# Altium PCB Zotino-DIOT.PCBDOC (part 8 of 11)
Units mil, origin at the board's own origin, x right, y up, seen from the top; angles counter-clockwise.
Board outline 8771.61 x 3949.04 mil, 4 copper layers (TopLayer, Internal Plane 2, Signal Layer 1, BottomLayer), stack 61.54 mil thick; 915 components, 534 nets, 3073 pads, 1180 vias.
Unrouted connection lines stored in the file: 36.
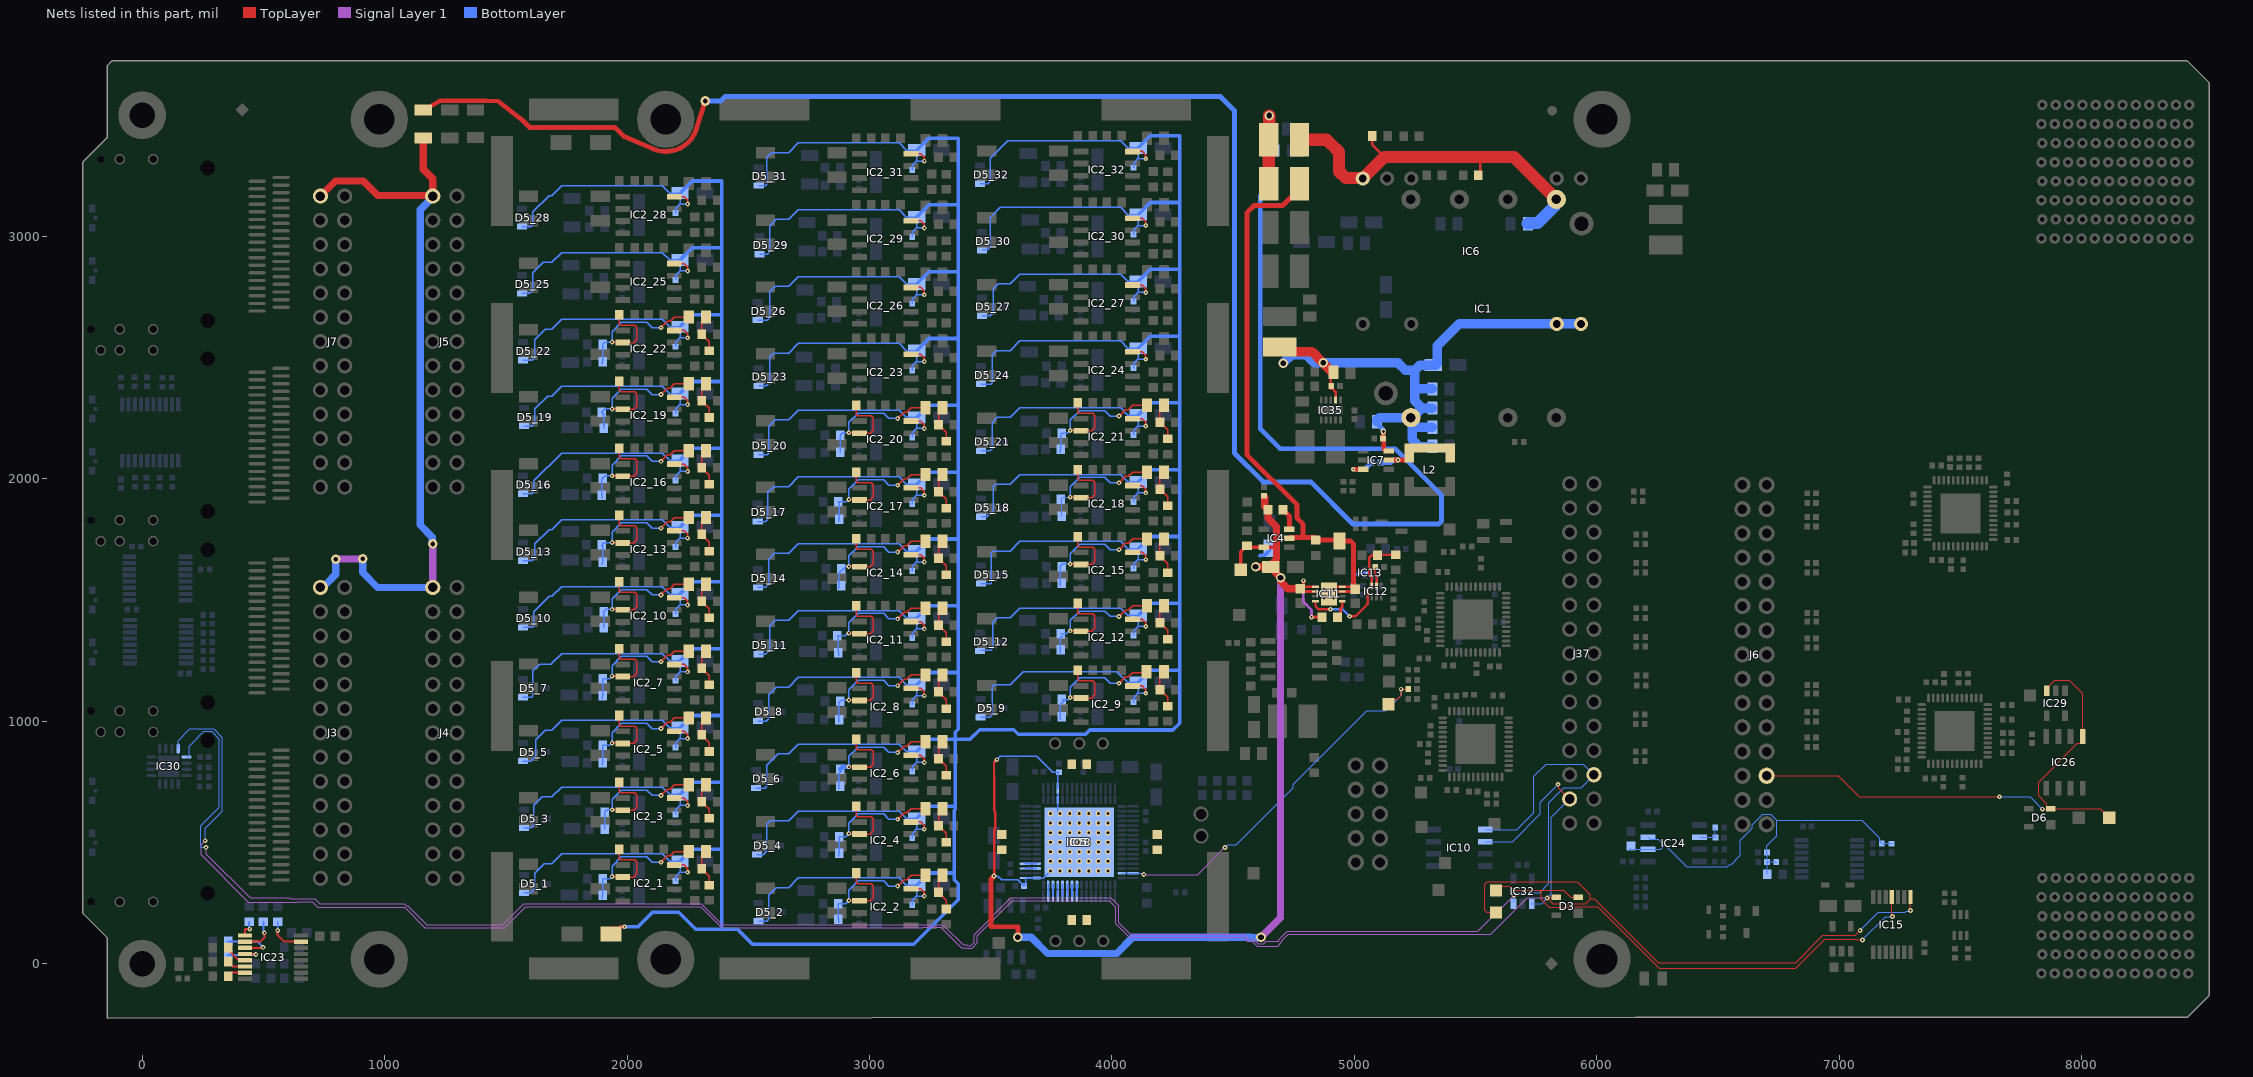
[diagram p9: the nets of this part, all layers, seen from the top]

## Via types
v1: diameter 19.68, hole 7.87, TopLayer to BottomLayer, tented both sides, 1050 vias
v2: diameter 23.62, hole 11.81, TopLayer to BottomLayer, tented both sides, 56 vias
v3: diameter 23.62, hole 11.81, TopLayer to BottomLayer, 28 vias
v4: diameter 39.37, hole 23.62, TopLayer to BottomLayer, tented both sides, 28 vias
v5: diameter 39.37, hole 19.68, TopLayer to BottomLayer, tented both sides, 7 vias
v6: diameter 19.68, hole 7.87, TopLayer to BottomLayer, tented bottom, 7 vias
v7: diameter 19.68, hole 7.87, TopLayer to BottomLayer, 4 vias

## Nets (pads, with @x,y where several pads share a name; then routed paths per layer and width w, separated by ;. In a path a pad name is that pad's centre, name@x,y a point inside that pad or via, vN(x,y) a via of type N, cw(c..) or ccw(c..) an arc to the next point about the centre after c; other vN are vias at no path point) (continued)
I2C_EEM1_SDA: D6.2 IC26.5 IC29.3 J6.26 TP19.1 | length 2250.8
  TopLayer w5: J6.26@6700.79,775.59 6996.06,775.59 7082.68,688.98 v1(7661.42,688.98) ; v1(7838.58,637.8) 7866.14,637.8 D6.2@7868.11,639.76 ; IC29.3@7856.3,1125.98 7856.3,1135.83 7889.76,1169.29 7948.82,1169.29 8004.13,1113.98 IC26.5@8004.13,937.01 8004.13,918.31 7994.82,909 7982.79,909 7822.83,749.04 7822.83,692.91 7854.86,660.89 7854.86,649.07 D6.2@7864.17,639.76 ; D6.2@7872.05,639.76 8076.77,639.76 TP19.1@8114.17,602.36
  BottomLayer w5: v1(7661.42,688.98) 7787.4,688.98 v1(7838.58,637.8)
I2C_SCL: D3.3 IC10.6 IC15.1 IC30.12 IC32.1 J37.27 TP12.1 | length 10332.9
  TopLayer w5: TP12.1@5584.41,212.13 5546.64,212.13 5538.24,220.54 5538.24,328.59 5548.64,339 5919.32,339 5973.48,284.84 5973.48,268.93 ; D3.3@5833.73,274.78 5833.53,274.58 5798.2,274.58 v1(5795.28,271.65) 5819.11,247.82 5954.84,247.82 5973.48,266.46 5973.48,268.93 ; v1(5840.35,740.73) 5843.16,737.92 5843.16,724.97 J37.27@5888.23,679.89 ; v1(7086.61,137.8) 7065.94,117.13 6933.07,117.13 6819.88,3.94 6254.17,3.94 5989.17,268.93 5973.48,268.93 ; v1(7293.89,219.89) IC15.1@7293.89,275.71
  Signal Layer 1 w5: v1(259.84,507.87) 244.09,492.13 244.09,448.82 438.5,254.41 641.73,254.41 643.23,255.91 700.79,255.91 724.41,232.28 1082.68,232.28 1165.35,149.61 1496.06,149.61 1582.68,236.22 2303.15,236.22 2389.76,149.61 3220.47,149.61 3222.39,151.52 3294.07,151.52 3378.66,66.93 3398.04,66.93 3400.24,64.73 3422.9,64.73 3425.1,66.93 3425.2,66.93 3444.49,86.22 3444.49,115.95 3588.38,259.84 3988.19,259.84 4015.75,232.28 4015.75,165.35 4070.87,110.24 4541.2,110.24 4558.85,92.59 4579.52,92.59 4599.52,72.59 4683.12,72.59 4700.79,90.26 4700.79,94.49 4728.35,122.05 5562.99,122.05 5712.6,271.65 v1(5795.28,271.65)
  BottomLayer w5: IC30.12@148.62,887.8 148.62,920.28 197.15,968.81 294.97,968.81 330.71,933.07 330.71,629.92 259.84,559.06 v1(259.84,507.87) ; IC10.6@5539.61,503.87 5652.98,503.87 5767.67,618.56 5767.67,666.89 5840.84,740.06 5840.35,740.54 v1(5840.35,740.73) ; IC32.1@5731.4,247.82 5732.31,248.73 5772.35,248.73 v1(5795.28,271.65) 5812.23,288.61 5812.23,603.89 J37.27@5888.23,679.89 ; v1(7086.61,137.8) 7161.04,212.22 7272.18,212.22 7277.04,217.08 7291.08,217.08 v1(7293.89,219.89)
I2C_SDA: D3.2 IC10.5 IC15.4 IC30.13 IC32.3 J37.26 TP11.1 | length 10261.1
  TopLayer w5: TP11.1@5584.41,302.69 5606.91,320.19 5641.34,320.19 5658.84,302.69 ; v1(5658.84,282.89) 5658.84,302.68 ; D3.2@5924.28,274.78 5891.84,274.78 5863.94,302.69 5770.67,302.69 ; v1(7095.56,98.43) 7076.77,98.43 7074.82,100.38 6939.95,100.38 6820.87,-18.7 6256.89,-18.7 6003.15,235.04 5887.51,235.04 5885.14,232.66 5804.74,232.66 5770.67,266.73 5770.67,302.69 ; IC15.4@7217.12,275.71 7217.12,197.25 v1(7219.49,194.88) ; 5658.84,302.69 5770.67,302.69
  Signal Layer 1 w5: v1(263.78,480.31) 263.78,452.76 444.88,271.65 606.3,271.65 610.24,267.72 712.6,267.72 732.28,248.03 1081.07,248.03 1088.95,240.16 1094.49,240.16 1173.23,161.42 1488.19,161.42 1574.8,248.03 2307.09,248.03 2393.7,161.42 3110.24,161.42 3110.34,161.52 3298.21,161.52 3306.19,153.54 3311.02,153.54 3385.83,78.74 3400.37,78.74 3404.39,74.73 3418.75,74.73 3420.95,76.93 3421.05,76.93 3424.07,79.94 3424.07,80.04 3431.26,87.24 3431.26,120.14 3582.77,271.65 3996.06,271.65 4027.56,240.16 4027.56,169.29 4074.8,122.05 4543.53,122.05 4562.99,102.59 4583.66,102.59 4603.66,82.59 4626.18,82.59 4636.18,92.59 4688.98,92.59 4688.98,99.38 4723.45,133.86 5509.81,133.86 v1(5658.84,282.89)
  BottomLayer w5: IC30.13@183.07,853.35 190.29,853.35 194.35,857.4 194.35,896.74 232.22,934.62 232.22,936.54 254.49,958.81 285.98,958.81 318.9,925.89 318.9,645.67 242.5,569.27 242.5,483.24 245.43,480.31 v1(263.78,480.31) ; IC10.5@5539.61,553.87 5670.29,553.87 5740,623.58 5740,773.3 5790.67,823.97 5893.11,823.97 5893.23,824.09 5944.03,824.09 J37.26@5988.23,779.89 5935.11,726.77 5864.6,726.77 5802.23,664.4 5802.23,331.28 5763.84,292.89 5668.84,292.89 v1(5658.84,282.89) IC32.3@5658.84,252.89 ; v1(7095.56,98.43) 7192.01,194.88 v1(7219.49,194.88)
LDACn: IC5.63 IC18.63 R101.1 TP17.1 | length 1616.3
  TopLayer w5: TP17.1@5141.5,1070.4 5162.81,1091.72 5176.59,1091.72 5193.15,1108.27 v1(5193.15,1132.89) 5194.15,1131.89 R101.1@5222.64,1131.89
  Signal Layer 1 w5: v1(4131.65,368.08) 4354.53,368.08 v1(4466.3,479.85)
  BottomLayer w5: IC18.63@4040.41,373.55 IC5.63@4086.67,373.55 4126.18,373.55 v1(4131.65,368.08) ; v1(4466.3,479.85) 4478.11,491.66 4513.54,491.66 4747.68,725.79 4747.68,739.79 5050.72,1042.84 5127.72,1042.84 5193.15,1108.27 v1(5193.15,1132.89)
LED0: IC23.15 R113.1 | length 163.3
  TopLayer w8: v1(558.84,137.89) 558.84,117.89 585.41,91.32 IC23.15@655.77,91.32
  BottomLayer w8: v1(558.84,137.89) 559.31,138.36 R113.1@559.31,173.01
LED1: IC23.1 R114.1 | length 77.3
  TopLayer w8: IC23.1@423.49,116.91 423.49,142.54 423.84,142.89 v1(443.84,142.89)
  BottomLayer w8: R114.1@441.2,173.01 441.2,145.53 v1(443.84,142.89)
LED2: IC23.2 R115.1 | length 153.8
  TopLayer w8: IC23.2@423.49,91.32 487.27,91.32 503.84,107.89 v1(503.84,127.89)
  BottomLayer w8: R115.1@500.26,173.01 500.26,131.47 v1(503.84,127.89)
LED3: IC23.3 R119.1 | length 230.6
  TopLayer w8: IC23.3@423.49,65.73 496.68,65.73 v1(498.84,67.89)
  BottomLayer w8: R119.1@354.59,92.3 474.43,92.3 v1(498.84,67.89)
LED4: IC23.4 R120.1 | length 160.8
  TopLayer w8: IC23.4@423.49,40.13 466.6,40.13 v1(468.84,37.89)
  BottomLayer w8: R120.1@354.59,37.18 468.13,37.18 v1(468.84,37.89)
LED5: IC23.5 R121.1 | length 95.1
  TopLayer w8: R121.1@354.59,66.71 354.59,58.9 398.95,14.54 IC23.5@423.49,14.54
LED6: IC23.6 R122.1 | length 76.6
  TopLayer w8: R122.1@354.59,7.65 373.29,-11.05 IC23.6@423.49,-11.05
LED7: IC23.7 R123.1 | length 75
  TopLayer w8: R123.1@354.59,-51.4 369.35,-36.64 IC23.7@423.49,-36.64
N12V0A: C1.2 C5.2 C6.1 C27.1 C29.2 C50.2 C53.2 C92_1.2 C92_2.2 C92_3.2 C92_4.2 C92_5.2 C92_6.2 C92_7.2 C92_8.2 C92_9.2 C92_10.2 C92_11.2 C92_12.2 C92_13.2 C92_14.2 C92_15.2 C92_16.2 C92_17.2 C92_18.2 C92_19.2 C92_20.2 C92_21.2 C92_22.2 C92_23.2 C92_24.2 C92_25.2 C92_26.2 C92_27.2 C92_28.2 C92_29.2 C92_30.2 C92_31.2 C92_32.2 C93_1.2 C93_2.2 C93_3.2 C93_4.2 C93_5.2 C93_6.2 C93_7.2 C93_8.2 C93_9.2 C93_10.2 C93_11.2 C93_12.2 C93_13.2 C93_14.2 C93_15.2 C93_16.2 C93_17.2 C93_18.2 C93_19.2 C93_20.2 C93_21.2 C93_22.2 C93_23.2 C93_24.2 C93_25.2 C93_26.2 C93_27.2 C93_28.2 C93_29.2 C93_30.2 C93_31.2 C93_32.2 C147.2 D2.2 D5_1.1 D5_2.1 D5_3.1 D5_4.1 D5_5.1 D5_6.1 D5_7.1 D5_8.1 D5_9.1 D5_10.1 D5_11.1 D5_12.1 D5_13.1 D5_14.1 D5_15.1 D5_16.1 D5_17.1 D5_18.1 D5_19.1 D5_20.1 D5_21.1 D5_22.1 D5_23.1 D5_24.1 D5_25.1 D5_26.1 D5_27.1 D5_28.1 D5_29.1 D5_30.1 D5_31.1 D5_32.1 IC2_1.4 IC2_2.4 IC2_3.4 IC2_4.4 IC2_5.4 IC2_6.4 IC2_7.4 IC2_8.4 IC2_9.4 IC2_10.4 IC2_11.4 IC2_12.4 IC2_13.4 IC2_14.4 IC2_15.4 IC2_16.4 IC2_17.4 IC2_18.4 IC2_19.4 IC2_20.4 IC2_21.4 IC2_22.4 IC2_23.4 IC2_24.4 IC2_25.4 IC2_26.4 IC2_27.4 IC2_28.4 IC2_29.4 IC2_30.4 IC2_31.4 IC2_32.4 IC4.5 IC5.17 IC5.36 IC11.1 IC11.2 IC18.17 IC18.36 IC18.65 R8.1 R8.2 R9.1 R9.2 R10.1 R10.2 R12.1 R12.2 R69.2 TP9.1 | length 54335.2
  TopLayer w6: IC2_1.4@2194.9,408 2235,408 2250,393 v1(2250,377.72) ; IC2_3.4@2194.9,683.59 2235,683.59 2250,668.59 v1(2250,653.31) ; IC2_5.4@2194.9,959.18 2235,959.18 2250,944.18 v1(2250,928.91) ; IC2_7.4@2194.9,1234.77 2235,1234.77 2250,1219.77 v1(2250,1204.5) ; IC2_10.4@2194.9,1510.36 2235,1510.36 2250,1495.36 v1(2250,1480.09) ; IC2_13.4@2194.9,1785.95 2235,1785.95 2250,1770.95 v1(2250,1755.68) ; IC2_16.4@2194.9,2061.54 2235,2061.54 2250,2046.54 v1(2250,2031.27) ; IC2_19.4@2194.9,2337.13 2235,2337.13 2250,2322.13 v1(2250,2306.86) ; IC2_22.4@2194.9,2612.72 2235,2612.72 2250,2597.72 v1(2250,2582.45) ; IC2_25.4@2194.9,2888.32 2235,2888.32 2250,2873.32 v1(2250,2858.04) ; IC2_28.4@2194.9,3163.91 2235,3163.91 2250,3148.91 v1(2250,3133.63) ; IC2_2.4@3171.28,309.57 3211.38,309.57 3226.38,294.57 v1(3226.38,279.3) ; IC2_4.4@3171.28,585.17 3211.38,585.17 3226.38,570.17 v1(3226.38,554.89) ; IC2_6.4@3171.28,860.76 3211.38,860.76 3226.38,845.76 v1(3226.38,830.48) ; IC2_8.4@3171.28,1136.35 3211.38,1136.35 3226.38,1121.35 v1(3226.38,1106.07) ; IC2_11.4@3171.28,1411.94 3211.38,1411.94 3226.38,1396.94 v1(3226.38,1381.66) ; IC2_14.4@3171.28,1687.53 3211.38,1687.53 3226.38,1672.53 v1(3226.38,1657.25) ; IC2_17.4@3171.28,1963.12 3211.38,1963.12 3226.38,1948.12 v1(3226.38,1932.84) ; IC2_20.4@3171.28,2238.71 3211.38,2238.71 3226.38,2223.71 v1(3226.38,2208.43) ; IC2_23.4@3171.28,2514.3 3211.38,2514.3 3226.38,2499.3 v1(3226.38,2484.02) ; IC2_26.4@3171.28,2789.89 3211.38,2789.89 3226.38,2774.89 v1(3226.38,2759.61) ; IC2_29.4@3171.28,3065.48 3211.38,3065.48 3226.38,3050.48 v1(3226.38,3035.2) ; IC2_31.4@3171.28,3341.07 3211.38,3341.07 3226.38,3326.07 v1(3226.38,3310.8) ; IC2_9.4@4084.67,1146.19 4124.76,1146.19 4139.76,1131.19 v1(4139.76,1115.91) ; IC2_12.4@4084.67,1421.78 4124.76,1421.78 4139.76,1406.78 v1(4139.76,1391.5) ; IC2_15.4@4084.67,1697.37 4124.76,1697.37 4139.76,1682.37 v1(4139.76,1667.09) ; IC2_18.4@4084.67,1972.96 4124.76,1972.96 4139.76,1957.96 v1(4139.76,1942.68) ; IC2_21.4@4084.67,2248.55 4124.76,2248.55 4139.76,2233.55 v1(4139.76,2218.27) ; IC2_24.4@4084.67,2524.14 4124.76,2524.14 4139.76,2509.14 v1(4139.76,2493.87) ; IC2_27.4@4084.67,2799.73 4124.76,2799.73 4139.76,2784.73 v1(4139.76,2769.46) ; IC2_30.4@4084.67,3075.32 4124.76,3075.32 4139.76,3060.32 v1(4139.76,3045.05) ; IC2_32.4@4084.67,3350.91 4124.76,3350.91 4139.76,3335.91 v1(4139.76,3320.64)
  TopLayer w10: v1(3513.54,361.74) 3515.35,363.56 3515.35,555.2 3518.11,557.96 3518.11,628.35 3515.35,631.1 3515.35,766.19 3515.07,766.47 3515.07,777.95 3513.54,779.48 3513.54,830.25 v1(3525.35,842.05)
  TopLayer w11.81: C29.2@4788.84,1547.35 4796.8,1555.31 IC11.1@4839.9,1555.31 ; v1(4790.12,1580.4) 4790.12,1560.63 C29.2@4776.84,1547.35 4788.56,1535.63 4789.27,1536.34 4822.75,1536.34 4823.46,1535.63 IC11.2@4839.9,1535.63 ; v1(4822.95,1429.97) 4867.24,1429.97 C27.1@4867.34,1429.87
  TopLayer w15: D2.2@1933.33,145.45 1966.62,145.45 1974.17,153 v1(1990,153) ; TP9.1@4531.56,1625.21 4531.56,1700.08 4555.2,1723.71 4564.16,1723.71 4569.83,1718.04 IC4.5@4624.02,1718.04 ; IC4.5@4620.69,1714.71 IC4.5@4624.02,1718.04 ; 4678.9,1716.07 4676.93,1718.04 IC4.5@4625.75,1718.04 IC4.5@4624.02,1718.04
  TopLayer w20: v1(3513.54,361.74) 3501.73,349.94 3501.73,153.08 3611.97,153.08 v4(3611.97,109.77)
  TopLayer w30: v4(4592.48,1637.33) C1.2@4655.28,1637.33 ; C5.2@4630.99,1924.73 4630.99,1886.03 C6.1@4643.46,1873.55 4643.46,1838.12 4678.9,1802.69 4678.9,1716.07 4678.9,1668.83 4655.28,1645.2 C1.2@4655.28,1637.33 ; C29.2@4776.84,1547.35 4725.57,1547.35 4697.37,1575.55 4697.37,1590.26 v4(4695.58,1592.06) 4675.71,1611.93 4675.71,1627.72 4666.1,1637.33 C1.2@4655.28,1637.33
  Signal Layer 1 w11.81: v1(4790.12,1580.4) 4789.07,1579.36 4789.07,1493.94 4822.95,1460.06 v1(4822.95,1429.97)
  Signal Layer 1 w30: v4(4614.92,109.77) 4695.58,190.43 v4(4695.58,1592.06)
  BottomLayer w6: D5_25.1@1566.69,2765.28 1598.19,2765.28 1611.97,2779.06 1611.97,2849.93 1655.35,2893.32 1690,2893.32 1730,2933.32 2145.77,2933.32 2175.77,2903.32 C93_25.2@2218.82,2903.32 2218.82,2859.22 ; D5_28.1@1566.69,3040.87 1602.13,3040.87 1611.97,3050.72 1611.97,3101.9 1678.98,3168.91 1690,3168.91 1730,3208.91 2145.77,3208.91 2175.77,3178.91 C93_28.2@2218.82,3178.91 2218.82,3134.81 ; D5_5.1@1570.63,836.15 1602.13,836.15 1623.78,857.8 1623.78,924.73 1663.23,964.18 1690,964.18 1730,1004.18 2145.77,1004.18 2175.77,974.18 C93_5.2@2218.82,974.18 2218.82,930.09 ; D5_7.1@1570.63,1099.93 1606.06,1099.93 1611.97,1105.83 1611.97,1208.2 1639.53,1235.76 1690,1235.76 1690,1239.77 1730,1279.77 2145.77,1279.77 2175.77,1249.77 C93_7.2@2218.82,1249.77 2218.82,1205.68 ; D5_10.1@1570.63,1387.33 1610,1387.33 1615.91,1393.24 1615.91,1452.29 1678.98,1515.36 1690,1515.36 1730,1555.36 2145.77,1555.36 2175.77,1525.36 C93_10.2@2218.82,1525.36 2218.82,1481.27 ; D5_13.1@1570.63,1662.92 1606.06,1662.92 1619.84,1676.7 1619.84,1731.82 1678.98,1790.95 1690,1790.95 1730,1830.95 2145.77,1830.95 2175.77,1800.95 C93_13.2@2218.82,1800.95 2218.82,1756.86 ; D5_16.1@1570.63,1938.51 1606.06,1938.51 1615.91,1948.35 1615.91,1992.45 1730,2106.54 2145.77,2106.54 2175.77,2076.54 C93_16.2@2218.82,2076.54 2218.82,2032.45 ; D5_22.1@1570.63,2489.69 1610,2489.69 1619.84,2499.54 1619.84,2574.34 1663.23,2617.72 1690,2617.72 1730,2657.72 2145.77,2657.72 2175.77,2627.72 C93_22.2@2218.82,2627.72 2218.82,2583.63 ; D5_1.1@1574.57,292.1 1602.13,292.1 1619.84,309.82 1619.84,373.55 1659.29,413 1690,413 1730,453 2145.77,453 2175.77,423 C93_1.2@2218.82,423 2218.82,378.91 ; D5_3.1@1574.57,560.56 1604.96,560.56 1615.91,571.51 1615.91,655.05 1649.45,688.59 1690,688.59 1730,728.59 2145.77,728.59 2175.77,698.59 C93_3.2@2218.82,698.59 2218.82,654.5 ; D5_19.1@1574.57,2218.04 1606.06,2218.04 1619.84,2231.82 1619.84,2288.92 1673.06,2342.13 1690,2342.13 1730,2382.13 2145.77,2382.13 2175.77,2352.13 C93_19.2@2218.82,2352.13 2218.82,2308.04 ; C92_1.2@2200,340.72 2200,360.09 2218.82,378.91 ; C92_3.2@2200,616.31 2200,635.68 2218.82,654.5 ; C92_5.2@2200,891.9 2200,911.27 2218.82,930.09 ; C92_7.2@2200,1167.49 2200,1186.86 2218.82,1205.68 ; C92_10.2@2200,1443.08 2200,1462.45 2218.82,1481.27 ; C92_13.2@2200,1718.67 2200,1738.04 2218.82,1756.86 ; C92_16.2@2200,1994.26 2200,2013.63 2218.82,2032.45 ; C92_19.2@2200,2269.85 2200,2289.22 2218.82,2308.04 ; C92_22.2@2200,2545.44 2200,2564.81 2218.82,2583.63 ; C92_25.2@2200,2821.03 2200,2840.4 2218.82,2859.22 ; C92_28.2@2200,3096.62 2200,3115.99 2218.82,3134.81 ; v1(2250,377.72) 2220,377.72 2218.82,378.91 ; v1(2250,653.31) 2220,653.31 2218.82,654.5 ; v1(2250,928.91) 2220,928.91 2218.82,930.09 ; v1(2250,1204.5) 2220,1204.5 2218.82,1205.68 ; v1(2250,1480.09) 2220,1480.09 2218.82,1481.27 ; v1(2250,1755.68) 2220,1755.68 2218.82,1756.86 ; v1(2250,2031.27) 2220,2031.27 2218.82,2032.45 ; v1(2250,2306.86) 2220,2306.86 2218.82,2308.04 ; v1(2250,2582.45) 2220,2582.45 2218.82,2583.63 ; v1(2250,2858.04) 2220,2858.04 2218.82,2859.22 ; v1(2250,3133.63) 2220,3133.63 2218.82,3134.81 ; D5_6.1@2531.88,725.16 2569.88,725.16 2576.54,731.82 2576.54,818.43 2623.86,865.76 2666.38,865.76 2706.38,905.76 3122.15,905.76 3152.15,875.76 C93_6.2@3195.2,875.76 3195.2,831.66 ; D5_4.1@2535.2,450.32 2562.76,450.32 2576.54,464.1 2576.54,575.83 2590.87,590.17 2666.38,590.17 2706.38,630.17 3122.15,630.17 3152.15,600.17 C93_4.2@3195.2,600.17 3195.2,556.07 ; D5_17.1@2539.13,1824.34 2570.63,1824.34 2580.47,1834.18 2580.47,1944.42 2604.17,1968.12 2666.38,1968.12 2706.38,2008.12 3122.15,2008.12 3152.15,1978.12 C93_17.2@3195.2,1978.12 3195.2,1934.02 ; D5_26.1@2539.13,2655.05 2578.5,2655.05 2588.35,2664.89 2588.35,2771.19 2612.05,2794.89 2666.38,2794.89 2706.38,2834.89 3122.15,2834.89 3152.15,2804.89 C93_26.2@3195.2,2804.89 3195.2,2760.8 ; D5_8.1@2539.33,1001.5 2574.57,1001.5 2584.6,1011.54 2584.6,1109.97 2615.98,1141.35 2666.38,1141.35 2706.38,1181.35 3122.15,1181.35 3152.15,1151.35 C93_8.2@3195.2,1151.35 3195.2,1107.25 ; D5_14.1@2539.33,1552.69 2570.63,1552.69 2584.41,1566.46 2584.41,1668.83 2608.11,1692.53 2666.38,1692.53 2706.38,1732.53 3122.15,1732.53 3152.15,1702.53 C93_14.2@3195.2,1702.53 3195.2,1658.43 ; D5_2.1@2543.07,175.94 2575.78,175.94 2584.41,184.57 2584.41,283 2615.98,314.57 2666.38,314.57 2706.38,354.57 3122.15,354.57 3152.15,324.57 C93_2.2@3195.2,324.57 3195.2,280.48 ; D5_11.1@2543.07,1277.09 2570.63,1277.09 2588.35,1294.81 2588.35,1393.24 2612.05,1416.94 2666.38,1416.94 2706.38,1456.94 3122.15,1456.94 3152.15,1426.94 C93_11.2@3195.2,1426.94 3195.2,1382.84 ; D5_20.1@2543.07,2099.93 2578.5,2099.93 2584.41,2105.83 2584.41,2216.07 2612.05,2243.71 2666.38,2243.71 2706.38,2283.71 3122.15,2283.71 3152.15,2253.71 C93_20.2@3195.2,2253.71 3195.2,2209.61 ; D5_23.1@2543.07,2383.39 2574.57,2383.39 2588.35,2397.17 2588.35,2503.47 2604.17,2519.3 2666.38,2519.3 2706.38,2559.3 3122.15,2559.3 3152.15,2529.3 C93_23.2@3195.2,2529.3 3195.2,2485.21 ; D5_31.1@2543.27,3210.17 2570.43,3210.17 2576.73,3216.46 2576.73,3326.5 2596.3,3346.07 2666.38,3346.07 2706.38,3386.07 3122.15,3386.07 3152.15,3356.07 C93_31.2@3195.2,3356.07 3195.2,3311.98 ; D5_29.1@2547.01,2926.7 2578.5,2926.7 2588.35,2936.54 2588.35,3042.84 2615.98,3070.48 2666.38,3070.48 2706.38,3110.48 3122.15,3110.48 3152.15,3080.48 C93_29.2@3195.2,3080.48 3195.2,3036.39 ; C92_2.2@3176.38,242.29 3176.38,261.66 3195.2,280.48 ; C92_4.2@3176.38,517.88 3176.38,537.25 3195.2,556.07 ; C92_6.2@3176.38,793.47 3176.38,812.84 3195.2,831.66 ; C92_8.2@3176.38,1069.06 3176.38,1088.43 3195.2,1107.25 ; C92_11.2@3176.38,1344.65 3176.38,1364.02 3195.2,1382.84 ; C92_14.2@3176.38,1620.24 3176.38,1639.62 3195.2,1658.43 ; C92_17.2@3176.38,1895.83 3176.38,1915.21 3195.2,1934.02 ; C92_20.2@3176.38,2171.43 3176.38,2190.8 3195.2,2209.61 ; C92_23.2@3176.38,2447.02 3176.38,2466.39 3195.2,2485.21 ; C92_26.2@3176.38,2722.61 3176.38,2741.98 3195.2,2760.8 ; C92_29.2@3176.38,2998.2 3176.38,3017.57 3195.2,3036.39 ; C92_31.2@3176.38,3273.79 3176.38,3293.16 3195.2,3311.98 ; v1(3226.38,279.3) 3196.38,279.3 3195.2,280.48 ; v1(3226.38,554.89) 3196.38,554.89 3195.2,556.07 ; v1(3226.38,830.48) 3196.38,830.48 3195.2,831.66 ; v1(3226.38,1106.07) 3196.38,1106.07 3195.2,1107.25 ; v1(3226.38,1381.66) 3196.38,1381.66 3195.2,1382.84 ; v1(3226.38,1657.25) 3196.38,1657.25 3195.2,1658.43 ; v1(3226.38,1932.84) 3196.38,1932.84 3195.2,1934.02 ; v1(3226.38,2208.43) 3196.38,2208.43 3195.2,2209.61 ; v1(3226.38,2484.02) 3196.38,2484.02 3195.2,2485.21 ; v1(3226.38,2759.61) 3196.38,2759.61 3195.2,2760.8 ; v1(3226.38,3035.2) 3196.38,3035.2 3195.2,3036.39 ; v1(3226.38,3310.8) 3196.38,3310.8 3195.2,3311.98 ; D5_32.1@3456.46,3218.04 3487.95,3218.04 3497.8,3227.88 3497.8,3322.37 3571.34,3395.91 4035.53,3395.91 4065.53,3365.91 C93_32.2@4108.58,3365.91 4108.58,3321.82 ; D5_9.1@3458.62,1017.25 3495.83,1017.25 3505.67,1027.09 3505.67,1143.14 3513.72,1151.19 3579.76,1151.19 3634.31,1205.73 4020.99,1205.73 4065.53,1161.19 C93_9.2@4108.58,1161.19 4108.58,1117.09 ; D5_12.1@3458.62,1292.84 3499.76,1292.84 3509.24,1302.32 3509.24,1408.62 3527.4,1426.78 3579.76,1426.78 3619.76,1466.78 4035.53,1466.78 4065.53,1436.78 C93_12.2@4108.58,1436.78 4108.58,1392.69 ; D5_15.1@3459.66,1568.43 3499.76,1568.43 3501.73,1570.4 3501.73,1696.39 3507.72,1702.37 3579.76,1702.37 3619.76,1742.37 4035.53,1742.37 4065.53,1712.37 C93_15.2@4108.58,1712.37 4108.58,1668.28 ; D5_18.1@3460.39,1844.02 3484.02,1844.02 3509.61,1869.61 3509.61,1968.04 3519.53,1977.96 3579.76,1977.96 3619.76,2017.96 4035.53,2017.96 4065.53,1987.96 C93_18.2@4108.58,1987.96 4108.58,1943.87 ; D5_21.1@3460.39,2115.68 3495.83,2115.68 3505.67,2125.52 3505.67,2231.82 3527.4,2253.55 3579.76,2253.55 3619.76,2293.55 4035.53,2293.55 4065.53,2263.55 C93_21.2@4108.58,2263.55 4108.58,2219.46 ; D5_24.1@3460.39,2391.27 3499.76,2391.27 3505.67,2397.17 3505.67,2511.35 3523.46,2529.14 3579.76,2529.14 3619.76,2569.14 4035.53,2569.14 4065.53,2539.14 C93_24.2@4108.58,2539.14 4108.58,2495.05 ; D5_27.1@3464.33,2672.2 3497.24,2672.2 3509.61,2684.57 3509.61,2783 3531.34,2804.73 3579.76,2804.73 3619.76,2844.73 4035.53,2844.73 4065.53,2814.73 C93_27.2@4108.58,2814.73 4108.58,2770.64 ; D5_30.1@3464.33,2946.39 3487.95,2946.39 3497.8,2956.23 3497.8,3078.28 3539.84,3120.32 4035.53,3120.32 4065.53,3090.32 C93_30.2@4108.58,3090.32 4108.58,3046.23 ; v1(3513.54,361.74) 3530.08,361.74 3545.3,346.51 3611.93,346.51 C53.2@3632.14,326.31 ; v1(3525.35,842.05) 3539.28,855.99 3689.88,855.99 3755.73,790.13 C50.2@3781.26,790.13 3776.63,785.5 IC5.36@3776.63,722.96 ; C53.2@3637.56,320.59 3637.56,320.88 C53.2@3632.14,326.31 ; v2(3747.1,383.39) 3717.57,353.87 IC18.17@3690.02,353.87 IC5.17@3643.76,353.87 3643.76,326.31 C53.2@3632.14,326.31 ; IC18.65@3776.63,625.52 IC18.36@3776.63,676.7 IC5.36@3776.63,703.57 ; C92_9.2@4089.77,1078.9 4089.76,1098.28 4108.58,1117.09 ; C92_12.2@4089.76,1354.49 4089.76,1373.87 4108.58,1392.69 ; C92_15.2@4089.76,1630.09 4089.76,1649.46 4108.58,1668.28 ; C92_18.2@4089.77,1905.68 4089.76,1925.05 4108.58,1943.87 ; C92_21.2@4089.77,2181.27 4089.76,2200.64 4108.58,2219.46 ; C92_24.2@4089.76,2456.86 4089.76,2476.23 4108.58,2495.05 ; C92_27.2@4089.76,2732.45 4089.76,2751.82 4108.58,2770.64 ; C92_30.2@4089.77,3008.04 4089.76,3027.41 4108.58,3046.23 ; C92_32.2@4089.76,3283.63 4089.76,3303 4108.58,3321.82 ; v1(4139.76,1115.91) 4109.76,1115.91 4108.58,1117.09 ; v1(4139.76,1391.5) 4109.76,1391.5 4108.58,1392.69 ; v1(4139.76,1667.09) 4109.76,1667.09 4108.58,1668.28 ; v1(4139.76,1942.68) 4109.76,1942.68 4108.58,1943.87 ; v1(4139.76,2218.27) 4109.76,2218.27 4108.58,2219.46 ; v1(4139.76,2493.87) 4109.76,2493.87 4108.58,2495.05 ; v1(4139.76,2769.46) 4109.76,2769.46 4108.58,2770.64 ; v1(4139.76,3045.05) 4109.76,3045.05 4108.58,3046.23 ; v1(4139.76,3320.64) 4109.76,3320.64 4108.58,3321.82
  BottomLayer w15: v1(1990,153) 2045.29,153 2105.11,212.82 2213.31,212.82 2283.13,143 2390,143 ; C93_1.2@2218.82,423 2268.82,473 2390,473 ; C93_3.2@2218.82,698.59 2268.82,748.59 2390,748.59 ; C93_5.2@2218.82,974.18 2268.82,1024.18 2390,1024.18 ; C93_7.2@2218.82,1249.77 2268.82,1299.77 2390,1299.77 ; C93_10.2@2218.82,1525.36 2268.82,1575.36 2390,1575.36 ; C93_13.2@2218.82,1800.95 2268.82,1850.95 2390,1850.95 ; C93_16.2@2218.82,2076.54 2268.82,2126.54 2390,2126.54 ; C93_19.2@2218.82,2352.13 2268.82,2402.13 2390,2402.13 ; C93_22.2@2218.82,2627.72 2268.82,2677.72 2390,2677.72 ; C93_25.2@2218.82,2903.32 2268.82,2953.32 2390,2953.32 ; C93_28.2@2218.82,3178.91 2268.82,3228.91 2390,3228.91 2390,2953.32 ; C93_2.2@3195.2,324.57 3245.2,374.57 3349.47,374.57 ; C93_4.2@3195.2,600.17 3245.2,650.17 3353.41,650.17 ; C93_6.2@3195.2,875.76 3245.2,925.76 3353.41,925.76 ; C93_8.2@3195.2,1151.35 3245.2,1201.35 3366.38,1201.35 ; C93_11.2@3195.2,1426.94 3245.2,1476.94 3366.38,1476.94 ; C93_14.2@3195.2,1702.53 3245.2,1752.53 3366.38,1752.53 ; C93_17.2@3195.2,1978.12 3245.2,2028.12 3366.38,2028.12 ; C93_20.2@3195.2,2253.71 3245.2,2303.71 3366.38,2303.71 ; C93_23.2@3195.2,2529.3 3245.2,2579.3 3366.38,2579.3 ; C93_26.2@3195.2,2804.89 3245.2,2854.89 3366.38,2854.89 ; C93_29.2@3195.2,3080.48 3245.2,3130.48 3366.38,3130.48 ; C93_31.2@3195.2,3356.07 3245.2,3406.07 3366.38,3406.07 3366.38,3130.48 ; C93_9.2@4108.58,1161.19 4158.58,1211.19 4279.76,1211.19 ; C93_12.2@4108.58,1436.78 4158.58,1486.78 4279.76,1486.78 ; C93_15.2@4108.58,1712.37 4158.58,1762.37 4279.76,1762.37 ; C93_18.2@4108.58,1987.96 4158.58,2037.96 4279.76,2037.96 ; C93_21.2@4108.58,2263.55 4158.58,2313.55 4279.76,2313.55 ; C93_24.2@4108.58,2539.14 4158.58,2589.14 4279.76,2589.14 ; C93_27.2@4108.58,2814.73 4158.58,2864.73 4279.76,2864.73 ; C93_30.2@4108.58,3090.32 4158.58,3140.32 4279.76,3140.32 ; C93_32.2@4108.58,3365.91 4158.58,3415.91 4279.76,3415.91 ; 4280,3415.91 4280,1211.42 4279.76,1211.19 ; 4610,1682.61 4611.27,1682.61 4614.59,1685.93 4633.2,1685.93 4633.2,1688.48 4650.3,1705.59 C147.2@4650.3,1713.87 ; 2390,143 2455.44,143 2517.9,80.55 3182.62,80.55 3366.38,264.3 3366.38,330.24 3349.47,347.15 3349.47,374.57 ; 2390,143 2390,473 ; 2390,473 2390,748.59 ; 2390,748.59 2390,1024.18 ; 2390,1024.18 2390,1299.77 ; 2390,1299.77 2390,1575.36 ; 2390,1575.36 2390,1850.95 ; 2390,1850.95 2390,2126.54 ; 2390,2126.54 2390,2402.13 ; 2390,2402.13 2390,2677.72 ; 2390,2677.72 2390,2953.32 ; 3349.47,374.57 3349.47,633.26 3353.41,637.19 3353.41,650.17 ; 3353.41,650.17 3353.41,925.76 ; 3353.41,925.76 3353.41,955.07 3366.38,968.04 3366.38,1201.35 ; 3353.41,925.76 3414.9,925.76 3454.49,965.34 3595.45,965.34 3613.72,947.07 3891.34,947.07 3908.6,964.33 4251.33,964.33 4279.76,992.76 4279.76,1211.19 ; 3366.38,1201.35 3366.38,1476.94 ; 3366.38,1476.94 3366.38,1752.53 ; 3366.38,1752.53 3366.38,2028.12 ; 3366.38,2028.12 3366.38,2303.71 ; 3366.38,2303.71 3366.38,2579.3 ; 3366.38,2579.3 3366.38,2854.89 ; 3366.38,2854.89 3366.38,3130.48
  BottomLayer w30: v4(3611.97,109.77) 3667.09,109.77 3734.02,42.84 4019.45,42.84 4086.38,109.77 4573.7,109.77 4575.99,107.49 4612.64,107.49 v4(4614.92,109.77)
  other v2: 3786.47,383.39 3825.84,383.39 3865.21,383.39 3904.58,383.39 3943.95,383.39 3983.32,383.39 3747.1,422.76 3786.47,422.76 3825.84,422.76 3865.21,422.76 3904.58,422.76 3943.95,422.76 3983.32,422.76 3747.1,462.13 3786.47,462.13 3825.84,462.13 3865.21,462.13 3904.58,462.13 3943.95,462.13 3983.32,462.13 3747.1,501.5 3786.47,501.5 3825.84,501.5 3865.21,501.5 3904.58,501.5 3943.95,501.5 3983.32,501.5 3747.1,540.87 3786.47,540.87 3825.84,540.87 3865.21,540.87 3904.58,540.87 3943.95,540.87 3983.32,540.87 3747.1,580.24 3786.47,580.24 3825.84,580.24 3865.21,580.24 3904.58,580.24 3943.95,580.24 3983.32,580.24 3747.1,619.61 3786.47,619.61 3825.84,619.61 3865.21,619.61 3904.58,619.61 3943.95,619.61 3983.32,619.61
N13V0: C141.2 IC1.4 IC6.11 L9.1 R4.1 R27.1 | length 1640.3
  TopLayer w10: R27.1@5074.27,3414.64 5074.27,3377.49 5123.72,3328.05 ; R4.1@5511.5,3253 5520,3261.5 5520,3328.05
  TopLayer w50: L9.1@4773.12,3399.29 4885.82,3399.29 4902.76,3382.34 4936.77,3348.34 4936.77,3268.54 4964.33,3240.98 5033.19,3240.98 IC6.11@5034.92,3239.25 5123.72,3328.05 5520,3328.05 5658.68,3328.05 IC1.4@5833.84,3152.89
  BottomLayer w50: C141.2@5715.43,3053 5717.99,3055.56 5756.62,3055.56 5828.04,3126.98 5828.04,3147.5 IC1.4@5833.54,3153
N13V0_SCSI: J3.26 J4.26 J5.26 J7.26 R32.2 | length 3062.2
  TopLayer w30: J7.26@735.19,3166.71 797.82,3229.33 911.42,3229.33 971.46,3169.29 1198.28,3169.29 1198.28,3238.44 1159.21,3277.52 R32.2@1159.21,3407.02 ; R32.2@1179.39,3407.02 R32.2@1179.39,3413.17
  Signal Layer 1 w30: v5(798.73,1668.79) 799.97,1670.02 908.21,1670.02 v5(909.45,1671.26) ; J4.26@1198.29,1552.53 1198.43,1552.68 1198.43,1731.67 v5(1198.58,1731.82)
  BottomLayer w30: J3.26@735.19,1552.53 744.12,1552.53 760.62,1569.03 760.96,1569.03 798.73,1606.8 v5(798.73,1668.79) ; v5(909.45,1671.26) 909.45,1614.17 971.09,1552.53 J4.26@1198.29,1552.53 ; J5.26@1198.29,3166.71 1198.28,3161.52 1146.79,3110.02 1146.79,1809.9 1196.79,1759.9 1196.79,1733.61 v5(1198.58,1731.82)
N_LDO_EN: C32.2 IC11.4 IC12.6 R35.2 | length 597.7
  TopLayer w10: IC11.4@4839.9,1496.26 4839.77,1496.26 4839.69,1496.18 4839.69,1475 4852,1462.69 v1(4901.23,1462.69) ; v1(4979.63,1433.5) 5004.3,1433.5 5055.43,1484.63 5055.43,1543.3 5061.29,1549.15 5071.04,1549.15 5071.04,1558.41 IC12.6@5071.55,1558.92 5071.55,1591.74 5062.25,1601.04 5062.25,1676.37 5070.67,1684.79 5094.2,1684.79 C32.2@5095.11,1685.7 5097.32,1687.92 R35.2@5171.67,1687.92
  BottomLayer w10: v1(4901.23,1462.69) 4950.45,1462.69 v1(4979.63,1433.5)
nc9: IC5.9 IC18.9 | length 46.3
  BottomLayer w7.87: IC5.9@3855.37,280.05 IC18.9@3855.37,326.31
nc10: IC5.10 IC18.10 | length 46.3
  BottomLayer w7.87: IC5.10@3835.69,280.05 IC18.10@3835.69,326.31
nc11: IC5.11 IC18.11 | length 46.3
  BottomLayer w7.87: IC5.11@3816,280.05 IC18.11@3816,326.31
nc12: IC5.12 IC18.12 | length 46.3
  BottomLayer w7.87: IC5.12@3796.32,280.05 IC18.12@3796.32,326.31
nc13: IC5.13 IC18.13 | length 46.3
  BottomLayer w7.87: IC5.13@3776.63,280.05 IC18.13@3776.63,326.31
nc14: IC5.14 IC18.14 | length 46.3
  BottomLayer w7.87: IC5.14@3756.94,280.05 IC18.14@3756.94,326.31
nc15: IC5.15 IC18.15 | length 46.3
  BottomLayer w7.87: IC5.15@3737.26,280.05 IC18.15@3737.26,326.31
nc19: IC5.19 IC18.19 | length 46.3
  BottomLayer w7.87: IC5.19@3643.76,393.24 IC18.19@3690.02,393.24
nc20: IC5.20 IC18.20 | length 46.3
  BottomLayer w7.87: IC5.20@3643.76,412.92 IC18.20@3690.02,412.92
NetC2_2: C2.2 C142.2 L9.2 L15.1 R32.1 | length 8536.2
  TopLayer w20: R32.1@1151.06,3524.13 1184.65,3533.83 1227.19,3558.83 1332.62,3560.05 1415.92,3560.05 1468.86,3557.84 1564.84,3482.67 1597.48,3450.02 1949.13,3450.02 1986.29,3412.87 2106.95,3361.36 ccw(c2159.21,3483.78) 2286.06,3443.43 v5(2322.83,3559.06)
  TopLayer w50: L15.1@4647.14,3225.96 L9.2@4647.14,3399.29 4649,3401.15 v4(4649,3499)
  BottomLayer w20: v5(2322.83,3559.06) 2385.9,3559.06 2404.38,3577.53 4447.28,3577.53 4505.67,3519.14 4505.67,2105.83 4623.78,1987.72 4820.63,1987.72 4994.1,1814.26 5348.51,1814.26 5360.23,1825.97 5360.23,1933.16 5168.81,2124.57 4694.04,2124.57 4612,2206.61 4612,3168.86 4655.28,3212.13 4655.28,3349.81 4649,3356.08 v4(4649,3499)
NetC3_2: C3.2 C28.2 C144.2 IC4.2 IC11.7 IC11.8 IC11.9 L15.2 | length 2361.5
  TopLayer w11.81: IC11.9@4868.45,1496.26 4895.02,1522.83 IC11.9@4895.02,1525.79 ; IC11.9@4921.6,1535.63 IC11.7@4950.14,1535.63 C28.2@4993.86,1535.63 ; IC11.9@4921.6,1555.31 IC11.8@4950.14,1555.31 C28.2@4994.58,1555.31
  TopLayer w20: IC4.2@4733.84,1757.89 4788.84,1757.89 ; L15.2@4773.12,3225.96 4773.12,3196.43 4704.69,3128 4587,3128 4556.85,3097.85 4556.85,2099.88 4763.84,1892.89 4763.84,1837.89 4788.84,1812.89 4788.84,1792.89 ; 4788.84,1787.89 4788.84,1757.89 ; C144.2@4840.32,1747.57 4934.8,1747.57 C3.2@4938.74,1743.63 4984.24,1743.63 4995.95,1731.91 4995.95,1553.94 C28.2@5004.06,1545.83 ; C144.2@4840.32,1757.89 4788.84,1757.89
  other v7: 4875.34,1506.1 4914.71,1506.1 4875.34,1545.47 4914.71,1545.47
NetC6_2: C6.2 IC4.3 | length 91.3
  TopLayer w20: C6.2@4706.46,1873.55 4732.05,1847.96 IC4.3@4732.05,1792.84
NetC16_1: C16.1 IC7.6 | length 127.9
  TopLayer w19.68: v1@4995.89,2040.28 IC7.6@5036.22,2040.28
  BottomLayer w19.68: v1(4995.61,2040) 5043.75,2040 C16.1@5071.65,2067.9
NetC16_2: C16.2 IC7.2 L2.1 | length 165.4
  TopLayer w19.68: IC7.2@5142.52,2077.68 v1(5179.7,2077.68) 5216.88,2077.68 5226.99,2087.79 L2.1@5226.99,2087.88
  BottomLayer w19.68: C16.2@5107.09,2067.9 5150.88,2067.9 5160.66,2077.68 v1(5179.7,2077.68)
NetC17_2: C17.2 C18.2 C136.1 C137.2 C138.2 C139.2 C140.2 C150.2 C151.2 IC1.1 IC6.22 IC6.23 IC7.3 IC35.2 L8.1 | length 2655
  TopLayer w10: C151.2@4902.81,2441.86 4902.81,2372.89 4908.84,2372.89 4922.5,2359.23 4922.5,2358.68 4922.66,2358.52 4922.66,2342.08 4922.5,2341.93 IC35.2@4922.5,2325.57
  TopLayer w19.68: v2(5119.74,2195.29) 5118.98,2194.53 5118.98,2164.77 5121.75,2162.01 5121.75,2125.03 5131.69,2115.08 IC7.3@5142.52,2115.08
  TopLayer w39.37: L8.1@4702.3,2544.81 4721.98,2525.13 4825.15,2525.13 v4(4871.32,2478.95) ; v4@4878.29,2470.17 C151.2@4906.75,2441.71
  BottomLayer w19.68: C18.2@5093.3,2236.38 5093.3,2229.49 5118.98,2203.81 5118.98,2196.04 v2(5119.74,2195.29)
  BottomLayer w39.37: v4(4706.46,2477.31) 4740.98,2511.84 4802.2,2511.84 4835.09,2478.95 v4(4871.32,2478.95) 5180.1,2478.95 5210,2449.05 5250,2449.05 ; C18.2@5093.3,2236.38 5093.3,2243.27 5103.02,2253 IC1.1@5233.54,2253 ; 5244.7,2213.75 C140.2@5321.82,2213.75 ; 5283.44,2292.49 C139.2@5321.82,2292.49 ; C138.2@5321.82,2371.23 5250,2371.23 ; C137.2@5323.84,2132.89 5268.84,2132.89 5238.84,2162.89 5238.84,2252.09 5279.24,2292.49 5250,2321.73 5250,2371.23 ; IC6.23@5934.92,2639.25 IC6.22@5834.92,2639.25 5432.44,2639.25 5341.51,2548.32 5341.51,2474.57 5336.59,2469.65 C136.1@5325.76,2469.65 5270.6,2469.65 5250,2449.05 ; 5250,2371.23 5250,2449.05
NetC27_2: C27.2 IC11.5 | length 74.6
  TopLayer w11.81: C27.2@4930.34,1429.87 4943.13,1442.66 4943.13,1464.65 4950.14,1471.65 IC11.5@4950.14,1496.26
NetC34_2: C34.2 IC12.5 | length 80.6
  TopLayer w10: C34.2@5086.27,1636.93 5086.27,1601.6 5091.83,1596.04 5091.83,1588.16 5091.75,1588.08 5091.75,1559.43 IC12.5@5091.24,1558.92
NetC37_2: C37.2 IC13.5 | length 92.9
  BottomLayer w10: C37.2@4995.81,1555.81 4995.81,1592.62 5016.14,1612.96 IC13.5@5043.51,1612.96
NetC41_2: C41.2 IC24.2 R76.2 | length 107.4
  BottomLayer w5: IC24.2@6423.76,522.31 6424.98,521.09 C41.2@6489.76,521.09 6489.1,521.76 R76.2@6489.1,561.73
NetC42_2: C42.2 IC24.6 IC24.7 R222.1 R223.1 R224.1 R225.1 R226.1 R227.1 | length 1680.5
  BottomLayer w5: C42.2@6132.78,476.23 6136.69,472.31 IC24.6@6211.17,472.31 6263.44,472.31 6278.93,487.8 ; IC24.7@6211.17,522.31 6220.48,513 6253.73,513 6278.93,487.8 ; R226.1@6702.16,420.26 R226.1@6704.06,420.26 ; R222.1@6704.06,368.56 R226.1@6704.06,420.26 ; R223.1@6739.78,420.02 6739.54,420.26 R226.1@6704.06,420.26 ; R225.1@7215.58,496.13 7215.41,496.3 R224.1@7175.22,496.3 7166.3,505.22 7166.3,518.74 7092.48,592.56 6741.75,592.56 ; 6278.93,487.8 6283.85,487.8 6370.28,401.37 6539.17,401.37 6546.66,408.86 6554.53,408.86 6592.74,447.07 6592.74,509.61 6641.75,558.62 6641.75,574.49 6683.82,616.56 6717.76,616.56 6741.75,592.56 ; R226.1@6704.06,420.26 6704.06,456.97 R227.1@6702.13,458.9 6702.13,487.83 6741.75,527.45 6741.75,592.56
NetC56_1_1: C56_1.1 R24_1.2 R25_1.1 | length 158.6
  TopLayer w6: C56_1.1@2325.43,463 2308.5,446.07 R24_1.2@2308.5,393 2340,361.5 R25_1.1@2340,324.5
NetC56_1_2: C56_1.2 IC2_1.6 R5_1.1 R7_1.1 R67_1.2 | length 804.1
  TopLayer w6: v1(1938.56,359.81) 1980.5,359.81 IC2_1.6@1982.31,358 2027.41,358 2040.2,370.79 2040.2,421.07 2031.62,429.65 1971.62,429.65 1968.5,432.76 R67_1.2@1968.5,473 ; v1(2140,419.02) 2166.3,445.31 2177.55,445.31 2195.23,463 C56_1.2@2254.57,463
  BottomLayer w6: R5_1.1@1897.9,267.5 R5_1.1@1897.9,283 ; R5_1.1@1899.37,283 R7_1.1@1899.37,349.93 1930.87,349.93 1938.56,357.63 v1(1938.56,359.81) 1938.56,402.82 1977.01,441.27 2081.62,441.27 2103.87,419.02 v1(2140,419.02)
NetC56_2_1: C56_2.1 R24_2.2 R25_2.1 | length 158.6
  TopLayer w6: C56_2.1@3301.81,364.58 3284.88,347.65 R24_2.2@3284.88,294.58 3316.38,263.08 R25_2.1@3316.38,226.07
NetC56_2_2: C56_2.2 IC2_2.6 R5_2.1 R7_2.1 R67_2.2 | length 804.5
  TopLayer w6: v1(2914.94,261.38) 2956.88,261.38 IC2_2.6@2958.68,259.57 3003.79,259.57 3016.57,272.36 3016.57,322.65 3008,331.22 2948,331.22 2944.88,334.34 R67_2.2@2944.88,374.57 ; v1(3116.38,320.59) 3142.67,346.89 3153.93,346.89 3171.61,364.58 C56_2.2@3230.94,364.58
  BottomLayer w6: R5_2.1@2871.81,184.57 R7_2.1@2871.81,247.57 2901.13,247.57 v1(2914.94,261.38) 2914.94,304.4 2953.39,342.84 3058,342.84 3080.25,320.59 v1(3116.38,320.59) ; R5_2.1@2874.27,169.07 R5_2.1@2874.27,184.57
NetC56_3_1: C56_3.1 R24_3.2 R25_3.1 | length 158.6
  TopLayer w6: C56_3.1@2325.43,738.59 2308.5,721.66 R24_3.2@2308.5,668.59 2340,637.09 R25_3.1@2340,600.09
NetC56_3_2: C56_3.2 IC2_3.6 R5_3.1 R7_3.1 R67_3.2 | length 783.4
  TopLayer w6: v1(1938.56,635.4) 1980.5,635.4 IC2_3.6@1982.31,633.59 2027.41,633.59 2040.2,646.38 2040.2,696.66 2031.62,705.24 1971.62,705.24 1968.5,708.35 R67_3.2@1968.5,748.59 ; v1(2140,694.61) 2166.3,720.91 2177.55,720.91 2195.23,738.59 C56_3.2@2254.57,738.59
  BottomLayer w6: R7_3.1@1907.24,554.65 R5_3.1@1907.24,625.52 1917.12,635.4 v1(1938.56,635.4) 1938.56,678.42 1977.01,716.86 2081.62,716.86 2103.87,694.61 v1(2140,694.61)
NetC56_4_1: C56_4.1 R24_4.2 R25_4.1 | length 158.6
  TopLayer w6: C56_4.1@3301.81,640.17 3284.88,623.24 R24_4.2@3284.88,570.17 3316.38,538.67 R25_4.1@3316.38,501.66
NetC56_4_2: C56_4.2 IC2_4.6 R5_4.1 R7_4.1 R67_4.2 | length 800.5
  TopLayer w6: v1(2914.94,536.97) 2956.88,536.97 IC2_4.6@2958.68,535.17 3003.79,535.17 3016.57,547.95 3016.57,598.24 3008,606.81 2948,606.81 2944.88,609.93 R67_4.2@2944.88,650.17 ; v1(3116.38,596.18) 3142.67,622.48 3153.93,622.48 3171.61,640.17 C56_4.2@3230.94,640.17
  BottomLayer w6: R7_4.1@2874.27,444.66 R7_4.1@2874.27,456.23 ; R7_4.1@2875.75,456.23 R5_4.1@2875.75,523.16 2901.13,523.16 v1(2914.94,536.97) 2914.94,579.99 2953.39,618.43 3058,618.43 3080.25,596.18 v1(3116.38,596.18)
NetC56_5_1: C56_5.1 R24_5.2 R25_5.1 | length 158.6
  TopLayer w6: C56_5.1@2325.43,1014.18 2308.5,997.25 R24_5.2@2308.5,944.18 2340,912.68 R25_5.1@2340,875.68
NetC56_5_2: C56_5.2 IC2_5.6 R5_5.1 R7_5.1 R67_5.2 | length 802.8
  TopLayer w6: v1(1938.56,910.99) 1980.5,910.99 IC2_5.6@1982.31,909.18 2027.41,909.18 2040.2,921.97 2040.2,972.25 2031.62,980.83 1971.62,980.83 1968.5,983.94 R67_5.2@1968.5,1024.18 ; v1(2140,970.2) 2166.3,996.5 2177.55,996.5 2195.23,1014.18 C56_5.2@2254.57,1014.18
  BottomLayer w6: R7_5.1@1897.9,818.68 R7_5.1@1897.9,830.24 ; R7_5.1@1899.37,830.24 R5_5.1@1899.37,901.11 1928.69,901.11 v1(1938.56,910.99) 1938.56,954.01 1977.01,992.45 2081.62,992.45 2103.87,970.2 v1(2140,970.2)
NetC56_6_1: C56_6.1 R24_6.2 R25_6.1 | length 158.6
  TopLayer w6: C56_6.1@3301.81,915.76 3284.88,898.83 R24_6.2@3284.88,845.76 3316.38,814.26 R25_6.1@3316.38,777.25
NetC56_6_2: C56_6.2 IC2_6.6 R5_6.1 R7_6.1 R67_6.2 | length 797.1
  TopLayer w6: v1(2914.94,812.56) 2956.88,812.56 IC2_6.6@2958.68,810.76 3003.79,810.76 3016.57,823.54 3016.57,873.83 3008,882.4 2948,882.4 2944.88,885.52 R67_6.2@2944.88,925.76 ; v1(3116.38,871.77) 3142.67,898.07 3153.93,898.07 3171.61,915.76 C56_6.2@3230.94,915.76
  BottomLayer w6: R7_6.1@2874.27,720.25 2874.27,783.65 R5_6.1@2886.5,795.87 ; v1(2914.94,812.56) 2914.94,855.58 2953.39,894.02 3058,894.02 3080.25,871.77 v1(3116.38,871.77)
  BottomLayer w20: R5_6.1@2879.69,802.69 2889.56,812.56 v1(2914.94,812.56)
NetC56_7_1: C56_7.1 R24_7.2 R25_7.1 | length 158.6
  TopLayer w6: C56_7.1@2325.43,1289.77 2308.5,1272.84 R24_7.2@2308.5,1219.77 2340,1188.28 R25_7.1@2340,1151.27
NetC56_7_2: C56_7.2 IC2_7.6 R5_7.1 R7_7.1 R67_7.2 | length 802.8
  TopLayer w6: v1(1938.56,1186.58) 1980.5,1186.58 IC2_7.6@1982.31,1184.77 2027.41,1184.77 2040.2,1197.56 2040.2,1247.84 2031.62,1256.42 1971.62,1256.42 1968.5,1259.54 R67_7.2@1968.5,1299.77 ; v1(2140,1245.79) 2166.3,1272.09 2177.55,1272.09 2195.23,1289.77 C56_7.2@2254.57,1289.77
  BottomLayer w6: R7_7.1@1897.9,1094.27 R7_7.1@1897.9,1105.83 ; R7_7.1@1899.37,1105.83 R5_7.1@1899.37,1176.7 1928.69,1176.7 v1(1938.56,1186.58) 1938.56,1229.6 1977.01,1268.04 2081.62,1268.04 2103.87,1245.79 v1(2140,1245.79)
NetC56_8_1: C56_8.1 R24_8.2 R25_8.1 | length 158.6
  TopLayer w6: C56_8.1@3301.81,1191.35 3284.88,1174.42 R24_8.2@3284.88,1121.35 3316.38,1089.85 R25_8.1@3316.38,1052.84
NetC56_8_2: C56_8.2 IC2_8.6 R5_8.1 R7_8.1 R67_8.2 | length 803.4
  TopLayer w6: v1(2914.94,1088.15) 2956.88,1088.15 IC2_8.6@2958.68,1086.35 3003.79,1086.35 3016.57,1099.13 3016.57,1149.42 3008,1157.99 2948,1157.99 2944.88,1161.11 R67_8.2@2944.88,1201.35 ; v1(3116.38,1147.36) 3142.67,1173.66 3153.93,1173.66 3171.61,1191.35 C56_8.2@3230.94,1191.35
  BottomLayer w6: R7_8.1@2874.27,995.84 2874.27,1076.8 R5_8.1@2879.69,1082.21 2885.62,1088.15 v1(2914.94,1088.15) 2914.94,1131.17 2953.39,1169.61 3058,1169.61 3080.25,1147.36 v1(3116.38,1147.36)
NetC56_9_1: C56_9.1 R24_9.2 R25_9.1 | length 158.6
  TopLayer w6: C56_9.1@4215.2,1201.19 4198.27,1184.26 R24_9.2@4198.27,1131.19 4229.76,1099.69 R25_9.1@4229.76,1062.68
NetC56_9_2: C56_9.2 IC2_9.6 R5_9.1 R7_9.1 R67_9.2 | length 808.8
  TopLayer w6: v1(3828.33,1097.99) 3870.26,1097.99 IC2_9.6@3872.07,1096.19 3917.17,1096.19 3929.96,1108.98 3929.96,1159.26 3921.39,1167.83 3861.39,1167.83 3858.27,1170.95 R67_9.2@3858.27,1211.19 ; v1(4029.76,1157.21) 4056.06,1183.5 4067.31,1183.5 4085,1201.19 C56_9.2@4144.33,1201.19
  BottomLayer w6: R7_9.1@3787.66,1005.69 3787.66,1069.08 R5_9.1@3800.9,1082.32 ; R5_9.1@3793.07,1090.15 R5_9.1@3808.73,1090.15 ; R5_9.1@3800.93,1082.36 R5_9.1@3808.73,1090.15 ; v1(4029.76,1157.21) 3993.63,1157.21 3971.39,1179.46 3866.77,1179.46 3828.33,1141.01 v1(3828.33,1097.99) 3820.49,1090.15 R5_9.1@3808.73,1090.15
NetC56_10_1: C56_10.1 R24_10.2 R25_10.1 | length 158.6
  TopLayer w6: C56_10.1@2325.43,1565.36 2308.5,1548.43 R24_10.2@2308.5,1495.36 2340,1463.87 R25_10.1@2340,1426.86
NetC56_10_2: C56_10.2 IC2_10.6 R5_10.1 R7_10.1 R67_10.2 | length 783.4
  TopLayer w6: v1(1938.56,1462.17) 1980.5,1462.17 IC2_10.6@1982.31,1460.36 2027.41,1460.36 2040.2,1473.15 2040.2,1523.43 2031.62,1532.01 1971.62,1532.01 1968.5,1535.13 R67_10.2@1968.5,1575.36 ; v1(2140,1521.38) 2166.3,1547.68 2177.55,1547.68 2195.23,1565.36 C56_10.2@2254.57,1565.36
  BottomLayer w6: R7_10.1@1903.31,1385.36 R5_10.1@1903.31,1452.29 1913.18,1462.17 v1(1938.56,1462.17) 1938.56,1505.19 1977.01,1543.63 2081.62,1543.63 2103.87,1521.38 v1(2140,1521.38)
NetC56_11_1: C56_11.1 R24_11.2 R25_11.1 | length 158.6
  TopLayer w6: C56_11.1@3301.81,1466.94 3284.88,1450.01 R24_11.2@3284.88,1396.94 3316.38,1365.44 R25_11.1@3316.38,1328.43
NetC56_11_2: C56_11.2 IC2_11.6 R5_11.1 R7_11.1 R67_11.2 | length 812.3
  TopLayer w6: v1(2914.94,1363.74) 2956.88,1363.74 IC2_11.6@2958.68,1361.94 3003.79,1361.94 3016.57,1374.72 3016.57,1425.01 3008,1433.58 2948,1433.58 2944.88,1436.7 R67_11.2@2944.88,1476.94 ; v1(3116.38,1422.96) 3142.67,1449.25 3153.93,1449.25 3171.61,1466.94 C56_11.2@3230.94,1466.94
  BottomLayer w6: R7_11.1@2871.81,1283 2871.81,1349.93 R5_11.1@2867.87,1353.87 2899.37,1353.87 2909.25,1363.74 v1(2914.94,1363.74) 2914.94,1406.76 2953.39,1445.2 3058,1445.2 3080.25,1422.96 v1(3116.38,1422.96) ; R7_11.1@2874.27,1271.43 R7_11.1@2874.27,1283
NetC56_12_1: C56_12.1 R24_12.2 R25_12.1 | length 158.6
  TopLayer w6: C56_12.1@4215.2,1476.78 4198.27,1459.85 R24_12.2@4198.27,1406.78 4229.76,1375.28 R25_12.1@4229.76,1338.27
NetC56_12_2: C56_12.2 IC2_12.6 R5_12.1 R7_12.1 R67_12.2 | length 799.3
  TopLayer w6: v1(3828.33,1373.58) 3870.26,1373.58 IC2_12.6@3872.07,1371.78 3917.17,1371.78 3929.96,1384.57 3929.96,1434.85 3921.39,1443.42 3861.39,1443.42 3858.27,1446.54 R67_12.2@3858.27,1486.78 ; v1(4029.76,1432.8) 4056.06,1459.09 4067.31,1459.09 4085,1476.78 C56_12.2@4144.33,1476.78
  BottomLayer w6: R7_12.1@3787.66,1281.28 3787.66,1344.67 R5_12.1@3796.93,1353.94 ; R5_12.1@3789.13,1361.74 3812.58,1361.74 v1@3824.42,1373.58 ; v1(3828.33,1373.58) v1@3824.42,1373.58 ; v1(4029.76,1432.8) 3993.63,1432.8 3971.39,1455.05 3866.77,1455.05 3828.33,1416.6 3828.33,1377.49 v1@3824.42,1373.58
NetC56_13_1: C56_13.1 R24_13.2 R25_13.1 | length 158.6
  TopLayer w6: C56_13.1@2325.43,1840.95 2308.5,1824.02 R24_13.2@2308.5,1770.95 2340,1739.46 R25_13.1@2340,1702.45
NetC56_13_2: C56_13.2 IC2_13.6 R5_13.1 R7_13.1 R67_13.2 | length 808.4
  TopLayer w6: v1(1938.56,1737.76) 1980.5,1737.76 IC2_13.6@1982.31,1735.95 2027.41,1735.95 2040.2,1748.74 2040.2,1799.02 2031.62,1807.6 1971.62,1807.6 1968.5,1810.72 R67_13.2@1968.5,1850.95 ; v1(2140,1796.97) 2166.3,1823.27 2177.55,1823.27 2195.23,1840.95 C56_13.2@2254.57,1840.95
  BottomLayer w6: R7_13.1@1897.9,1645.45 R7_13.1@1897.9,1657.02 ; R7_13.1@1899.37,1657.02 1899.37,1723.94 R5_13.1@1895.43,1727.88 1905.31,1737.76 v1(1938.56,1737.76) 1938.56,1780.78 1977.01,1819.22 2081.62,1819.22 2103.87,1796.97 v1(2140,1796.97)
NetC56_14_1: C56_14.1 R24_14.2 R25_14.1 | length 158.6
  TopLayer w6: C56_14.1@3301.81,1742.53 3284.88,1725.6 R24_14.2@3284.88,1672.53 3316.38,1641.03 R25_14.1@3316.38,1604.02
NetC56_14_2: C56_14.2 IC2_14.6 R5_14.1 R7_14.1 R67_14.2 | length 793.2
  TopLayer w6: v1(2914.94,1639.33) 2956.88,1639.33 IC2_14.6@2958.68,1637.53 3003.79,1637.53 3016.57,1650.32 3016.57,1700.6 3008,1709.17 2948,1709.17 2944.88,1712.29 R67_14.2@2944.88,1752.53 ; v1(3116.38,1698.55) 3142.67,1724.84 3153.93,1724.84 3171.61,1742.53 C56_14.2@3230.94,1742.53
  BottomLayer w6: R7_14.1@2874.27,1547.02 2874.27,1610.42 2903.18,1639.33 v1(2914.94,1639.33) 2914.94,1682.35 2953.39,1720.8 3058,1720.8 3080.25,1698.55 v1(3116.38,1698.55)
NetC56_15_1: C56_15.1 R24_15.2 R25_15.1 | length 158.6
  TopLayer w6: C56_15.1@4215.2,1752.37 4198.27,1735.44 R24_15.2@4198.27,1682.37 4229.76,1650.87 R25_15.1@4229.76,1613.86
NetC56_15_2: C56_15.2 IC2_15.6 R5_15.1 R7_15.1 R67_15.2 | length 804.6
  TopLayer w6: v1(3828.33,1649.17) 3870.26,1649.17 IC2_15.6@3872.07,1647.37 3917.17,1647.37 3929.96,1660.16 3929.96,1710.44 3921.39,1719.01 3861.39,1719.01 3858.27,1722.13 R67_15.2@3858.27,1762.37 ; v1(4029.76,1708.39) 4056.06,1734.68 4067.31,1734.68 4085,1752.37 C56_15.2@4144.33,1752.37
  BottomLayer w6: R7_15.1@3787.66,1556.87 3787.66,1639.79 3797.04,1649.17 v1(3828.33,1649.17) 3828.33,1692.19 3866.77,1730.64 3971.39,1730.64 3993.63,1708.39 v1(4029.76,1708.39)
NetC56_16_1: C56_16.1 R24_16.2 R25_16.1 | length 158.6
  TopLayer w6: C56_16.1@2325.43,2116.54 2308.5,2099.61 R24_16.2@2308.5,2046.54 2340,2015.05 R25_16.1@2340,1978.04
NetC56_16_2: C56_16.2 IC2_16.6 R5_16.1 R7_16.1 R67_16.2 | length 804.5
  TopLayer w6: v1(1938.56,2013.35) 1980.5,2013.35 IC2_16.6@1982.31,2011.54 2027.41,2011.54 2040.2,2024.33 2040.2,2074.61 2031.62,2083.19 1971.62,2083.19 1968.5,2086.31 R67_16.2@1968.5,2126.54 ; v1(2140,2072.56) 2166.3,2098.86 2177.55,2098.86 2195.23,2116.54 C56_16.2@2254.57,2116.54
  BottomLayer w6: R7_16.1@1895.43,1932.61 1895.43,1999.54 R5_16.1@1899.37,2003.47 1909.25,2013.35 v1(1938.56,2013.35) 1938.56,2056.37 1977.01,2094.81 2081.62,2094.81 2103.87,2072.56 v1(2140,2072.56) ; R7_16.1@1897.9,1921.04 R7_16.1@1897.9,1932.61
NetC56_17_1: C56_17.1 R24_17.2 R25_17.1 | length 158.6
  TopLayer w6: C56_17.1@3301.81,2018.12 3284.88,2001.19 R24_17.2@3284.88,1948.12 3316.38,1916.62 R25_17.1@3316.38,1879.61
NetC56_17_2: C56_17.2 IC2_17.6 R5_17.1 R7_17.1 R67_17.2 | length 808.4
  TopLayer w6: v1(2914.94,1914.92) 2956.88,1914.92 IC2_17.6@2958.68,1913.12 3003.79,1913.12 3016.57,1925.91 3016.57,1976.19 3008,1984.76 2948,1984.76 2944.88,1987.88 R67_17.2@2944.88,2028.12 ; v1(3116.38,1974.14) 3142.67,2000.43 3153.93,2000.43 3171.61,2018.12 C56_17.2@3230.94,2018.12
  BottomLayer w6: R7_17.1@2874.27,1822.61 R7_17.1@2874.27,1834.18 ; R7_17.1@2875.75,1834.18 2875.75,1901.11 R5_17.1@2871.81,1905.05 2905.07,1905.05 v1(2914.94,1914.92) 2914.94,1957.94 2953.39,1996.39 3058,1996.39 3080.25,1974.14 v1(3116.38,1974.14)
NetC56_18_1: C56_18.1 R24_18.2 R25_18.1 | length 158.6
  TopLayer w6: C56_18.1@4215.2,2027.96 4198.27,2011.03 R24_18.2@4198.27,1957.96 4229.76,1926.46 R25_18.1@4229.76,1889.46
NetC56_18_2: C56_18.2 IC2_18.6 R5_18.1 R7_18.1 R67_18.2 | length 792.1
  TopLayer w6: v1(3828.33,1924.77) 3870.26,1924.77 IC2_18.6@3872.07,1922.96 3917.17,1922.96 3929.96,1935.75 3929.96,1986.03 3921.39,1994.61 3861.39,1994.61 3858.27,1997.72 R67_18.2@3858.27,2037.96 ; v1(4029.76,1983.98) 4056.06,2010.28 4067.31,2010.28 4085,2027.96 C56_18.2@4144.33,2027.96
  BottomLayer w5: R5_18.1@3793.07,1845.99 3793.07,1912.92 R7_18.1@3789.13,1916.86 3797.04,1924.77 v1(3828.33,1924.77)
  BottomLayer w6: v1(3828.33,1924.77) 3828.33,1967.78 3866.77,2006.23 3971.39,2006.23 3993.63,1983.98 v1(4029.76,1983.98)
NetC56_19_1: C56_19.1 R24_19.2 R25_19.1 | length 158.6
  TopLayer w6: C56_19.1@2325.43,2392.13 2308.5,2375.21 R24_19.2@2308.5,2322.13 2340,2290.64 R25_19.1@2340,2253.63
NetC56_19_2: C56_19.2 IC2_19.6 R5_19.1 R7_19.1 R67_19.2 | length 796.2
  TopLayer w6: v1(1938.56,2288.94) 1980.5,2288.94 IC2_19.6@1982.31,2287.13 2027.41,2287.13 2040.2,2299.92 2040.2,2350.2 2031.62,2358.78 1971.62,2358.78 1968.5,2361.9 R67_19.2@1968.5,2402.13 ; v1(2140,2348.15) 2166.3,2374.45 2177.55,2374.45 2195.23,2392.13 C56_19.2@2254.57,2392.13
  BottomLayer w6: R5_19.1@1903.31,2208.2 1903.31,2267.25 R7_19.1@1895.43,2275.13 1909.25,2288.94 v1(1938.56,2288.94) 1938.56,2331.96 1977.01,2370.4 2081.62,2370.4 2103.87,2348.15 v1(2140,2348.15)
NetC56_20_1: C56_20.1 R24_20.2 R25_20.1 | length 158.6
  TopLayer w6: C56_20.1@3301.81,2293.71 3284.88,2276.78 R24_20.2@3284.88,2223.71 3316.38,2192.21 R25_20.1@3316.38,2155.21
NetC56_20_2: C56_20.2 IC2_20.6 R5_20.1 R7_20.1 R67_20.2 | length 787.3
  TopLayer w6: v1(2914.94,2190.51) 2956.88,2190.51 IC2_20.6@2958.68,2188.71 3003.79,2188.71 3016.57,2201.5 3016.57,2251.78 3008,2260.35 2948,2260.35 2944.88,2263.47 R67_20.2@2944.88,2303.71 ; v1(3116.38,2249.73) 3142.67,2276.02 3153.93,2276.02 3171.61,2293.71 C56_20.2@3230.94,2293.71
  BottomLayer w6: R7_20.1@2879.69,2109.77 R5_20.1@2879.69,2180.64 2889.56,2190.51 v1(2914.94,2190.51) 2914.94,2233.53 2953.39,2271.98 3058,2271.98 3080.25,2249.73 v1(3116.38,2249.73)
NetC56_21_1: C56_21.1 R24_21.2 R25_21.1 | length 158.6
  TopLayer w6: C56_21.1@4215.2,2303.55 4198.27,2286.62 R24_21.2@4198.27,2233.55 4229.76,2202.05 R25_21.1@4229.76,2165.05
NetC56_21_2: C56_21.2 IC2_21.6 R5_21.1 R7_21.1 R67_21.2 | length 799.5
  TopLayer w6: v1(3828.33,2200.36) 3870.26,2200.36 IC2_21.6@3872.07,2198.55 3917.17,2198.55 3929.96,2211.34 3929.96,2261.62 3921.39,2270.2 3861.39,2270.2 3858.27,2273.31 R67_21.2@3858.27,2313.55 ; v1(4029.76,2259.57) 4056.06,2285.87 4067.31,2285.87 4085,2303.55 C56_21.2@4144.33,2303.55
  BottomLayer w6: R7_21.1@3787.66,2108.05 R7_21.1@3787.66,2121.58 ; R7_21.1@3789.13,2121.58 3789.13,2184.57 R5_21.1@3793.07,2188.51 3816.69,2188.51 3828.33,2200.15 v1(3828.33,2200.36) 3828.33,2243.38 3866.77,2281.82 3971.39,2281.82 3993.63,2259.57 v1(4029.76,2259.57)
NetC56_22_1: C56_22.1 R24_22.2 R25_22.1 | length 158.6
  TopLayer w6: C56_22.1@2325.43,2667.73 2308.5,2650.8 R24_22.2@2308.5,2597.72 2340,2566.23 R25_22.1@2340,2529.22
NetC56_22_2: C56_22.2 IC2_22.6 R5_22.1 R7_22.1 R67_22.2 | length 802.8
  TopLayer w6: v1(1938.56,2564.53) 1980.5,2564.53 IC2_22.6@1982.31,2562.72 2027.41,2562.72 2040.2,2575.51 2040.2,2625.8 2031.62,2634.37 1971.62,2634.37 1968.5,2637.49 R67_22.2@1968.5,2677.72 ; v1(2140,2623.74) 2166.3,2650.04 2177.55,2650.04 2195.23,2667.73 C56_22.2@2254.57,2667.73
  BottomLayer w6: R7_22.1@1897.9,2472.22 R7_22.1@1897.9,2483.79 ; R7_22.1@1899.37,2483.79 R5_22.1@1899.37,2554.65 1909.25,2564.53 v1(1938.56,2564.53) 1938.56,2607.55 1977.01,2645.99 2081.62,2645.99 2103.87,2623.74 v1(2140,2623.74)